# Altium PCB video.altium-saved.PcbDoc (part 5 of 5)
Units mil, origin at the board's own origin, x right, y up, seen from the top; angles counter-clockwise.
Board outline 12285 x 4200 mil, 4 copper layers (top_copper, Mid-Layer 1, Mid-Layer 2, Bottom Layer), stack 68.6 mil thick; 189 components, 588 nets, 2118 pads, 808 vias.
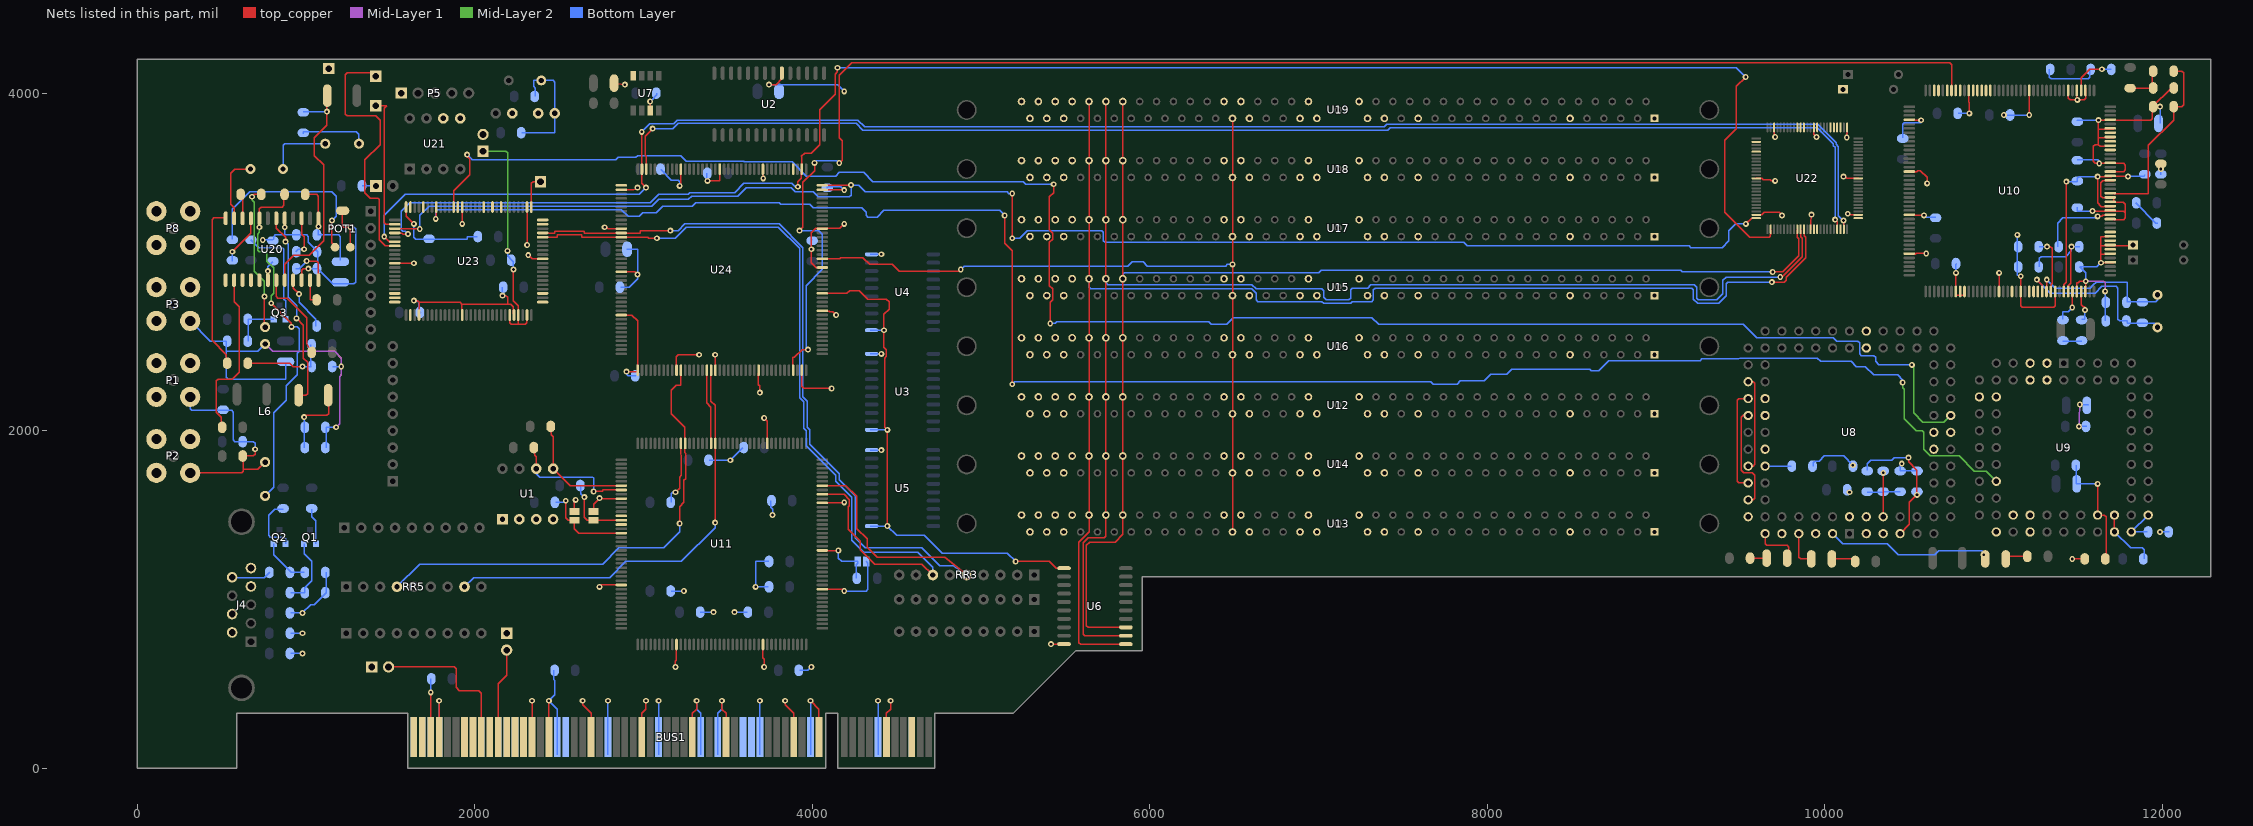
[diagram p7: the nets of this part, all layers, seen from the top]

## Via types
v1: diameter 35, hole 15.75, top_copper to Bottom Layer, 807 vias
v2: diameter 31.5, hole 15.75, top_copper to Bottom Layer, 1 vias

## Nets (pads, with @x,y where several pads share a name; then routed paths per layer and width w, separated by ;. In a path a pad name is that pad's centre, name@x,y a point inside that pad or via, vN(x,y) a via of type N, cw(c..) or ccw(c..) an arc to the next point about the centre after c; other vN are vias at no path point) (continued)
/TVRAM29: U6.13 U12.60 U13.60 U14.60 U15.60 U16.60 U17.60 U18.60 U19.60 U22.60 | length 7768.6
  top_copper w7.87: U19.60@5840,3950 U18.60@5840,3600 U17.60@5840,3250 U15.60@5840,2900 U16.60@5840,2550 U12.60@5840,2200 U14.60@5840,1850 U13.60@5840,1500 5840,1385 5795,1340 5645,1340 5625,1320 5625,845 5635,835 U6.13@5865,835 ; v1(9690,2940) 9750,2940 9845,3035 9845,3136 9836,3145 U22.60@9836,3190
  Bottom Layer w7.87: U15.60@5840,2900 5840,2925 5850,2935 7000,2935 7015,2950 9145,2950 9155,2940 v1(9690,2940)
/TVRAM30: U6.12 U12.62 U13.62 U14.62 U15.62 U16.62 U17.62 U18.62 U19.62 U22.61 | length 8203.7
  top_copper w7.87: U19.62@5740,3950 U18.62@5740,3600 U17.62@5740,3250 U15.62@5740,2900 U16.62@5740,2550 U12.62@5740,2200 U14.62@5740,1850 U13.62@5740,1500 5740,1375 5730,1365 5635,1365 5605,1335 5605,795 5615,785 U6.12@5865,785 ; v1(9735,2910) 9745,2910 9865,3030 9865,3141 9856,3150 U22.61@9856,3190
  Bottom Layer w7.87: U15.62@5740,2900 5740,2875 5750,2865 6605,2865 6630,2840 7020,2840 7030,2830 7030,2790 7045,2775 7180,2775 7190,2785 7190,2835 7200,2845 7290,2845 7310,2865 9225,2865 9240,2850 9240,2785 9250,2775 9360,2775 9395,2810 9395,2890 9415,2910 v1(9735,2910)
/TVRAM31: U6.11 U12.64 U13.64 U14.64 U15.64 U16.64 U17.64 U18.64 U19.64 U22.62 | length 8352
  top_copper w7.87: U19.64@5640,3950 U18.64@5640,3600 U17.64@5640,3250 U15.64@5640,2900 U16.64@5640,2550 U12.64@5640,2200 U14.64@5640,1850 U13.64@5640,1500 5640,1400 5580,1340 5580,745 5590,735 U6.11@5865,735 ; v1(9685,2880) 9760,2880 9770,2890 9770,2910 9885,3025 9885,3146 9876,3155 U22.62@9876,3190
  Bottom Layer w7.87: U15.64@5640,2900 5640,2850 5650,2840 6605,2840 6630,2815 6630,2775 6640,2765 7020,2765 7030,2755 7190,2755 7200,2765 7315,2765 7325,2775 7325,2835 7335,2845 9210,2845 9220,2835 9220,2780 9245,2755 9370,2755 9415,2800 9415,2870 9425,2880 v1(9685,2880)
/VD_PAL-: U10.34 U24.37 | length 8969.4
  top_copper w7.87: U24.37@3886,2340 3886,2435 3895,2435 3940,2480 v1(3975,2480) ; v1(3925,3185) 3945,3205 3945,3471.59 4013.63,3540.23 v1(4013.63,3586.64) ; v1(4160,3585.63) 4177.5,3603.13 4177.5,3718.42 4160,3735.92 4160,4105 4235,4180 10740,4180 10751,4169 U10.34@10751,4030
  Bottom Layer w7.87: v1(3925,3185) 4040,3185 4060,3165 4060,2955 3965,2860 3965,2490 v1(3975,2480) ; v1(4013.63,3586.64) 4026.07,3599.08 4146.55,3599.08 v1(4160,3585.63)
/WRAM-: U12.47 U13.47 U14.47 U15.47 U16.47 U17.47 U18.47 U19.47 U24.63 | length 4939.4
  top_copper w7.87: U24.63@4078,3018 4165,3018 4165,3025 4300,3025 4340,2985 4475,2985 4515,2945 4870,2945 v1(4880,2955) ; U13.47@6490,1400 U14.47@6490,1750 U12.47@6490,2100 U16.47@6490,2450 U15.47@6490,2800 v1(6490,2985) U17.47@6490,3150 U18.47@6490,3500 U19.47@6490,3850
  Bottom Layer w7.87: v1(4880,2955) 4900,2975 5870,2975 5895,3000 5960,3000 5985,2975 6450,2975 6460,2985 v1(6490,2985)
/WRCAD-: U8.24 U23.69 | length 10662.8
  top_copper w7.87: U23.69@1876,3320 1876,3365 1875,3365 1875,3420 1970,3515 1970,3609.54 1955.69,3623.85 v1(1955.69,3635) ; v1(5410,2635) 5410,2760 5425,2775 5425,2840 5405,2860 5405,3115 5425,3135 5425,3170 5405,3190 5405,3385 5430,3410 v1(5430,3460)
  Mid-Layer 2 w7.87: v1(10515,2390) 10525,2380 10525,2105 10580,2050 10705,2050 U8.24@10745,2090
  Bottom Layer w7.87: v1(1955.69,3635) 1985.69,3605 2835,3605 2850,3620 2955,3620 2965,3630 3220,3630 3255,3595 3594.35,3595 3597.23,3592.13 3881.55,3592.13 3965.99,3507.7 4043.28,3507.7 4043.4,3507.82 4123.56,3507.82 4138.88,3507.82 4161.07,3530 4305,3530 4360,3475 5250,3475 5265,3460 v1(5430,3460) ; v1(5410,2635) 5440,2635 5450,2645 6350,2645 6365,2630 6455,2630 6495,2670 7315,2670 7355,2630 9515,2630 9595,2550 10050,2550 10070,2530 10195,2530 10205,2520 10205,2455 10215,2445 10290,2445 10300,2435 10300,2410 10320,2390 v1(10515,2390)
/WRCDA-: U9.23 U23.73 | length 11036.1
  top_copper w7.87: v1(1770,3255) 1770,3265 1773,3265 U23.73@1773,3320 ; v1(5140,3275) 5140,3110 5185,3065 v1(5185,2275)
  Mid-Layer 2 w7.87: v1(10460,2285) 10460,2255 10470,2245 10470,2070 10540,2000 10575,2000 10585,1990 10585,1890 10625,1850 10795,1850 10885,1760 10955,1760 U9.23@11015,1700
  Bottom Layer w7.87: v1(1770,3255) 1770,3300 1780,3310 2870,3310 2910,3270 2975,3270 2995,3290 3075,3290 3115,3330 3290,3330 3310,3350 3805,3350 3815,3340 3985,3340 4005,3320 4295,3320 4320,3295 4320,3275 4330,3265 4385,3265 4425,3305 5110,3305 v1(5140,3275) ; v1(5185,2275) 5200,2290 7665,2290 7680,2275 7820,2275 7840,2295 7980,2295 8020,2335 8115,2335 8145,2365 8605,2365 8615,2355 8660,2355 8720,2415 9260,2415 9270,2425 9490,2425 9495,2430 9955,2430 9975,2410 10155,2410 10185,2380 10240,2380 10290,2330 10430,2330 10460,2300 v1(10460,2285)
/WRFIFDO-: RR5.8 U11.102 U24.18 | length 2555.3
  top_copper w7.87: U24.18@3400,2340 3400,2175 3425,2150 3425,1943 v1(3425,1455)
  Bottom Layer w7.87: RR5.8@1940,1075 1995,1130 2800,1130 2895,1225 3225,1225 3425,1425 v1(3425,1455)
/WRFULL: U11.103 U24.17 | length 407.8
  top_copper w7.87: U24.17@3374,2340 3374,2166 3400,2140 U11.103@3400,1943
/WRITE_RAM: U3.1 U4.1 U5.1 U6.1 U24.55 | length 3193.5
  top_copper w7.87: U24.55@4078,2813 4205,2813 4222,2830 4280,2830 4330,2780 4440,2780 4455,2765 4455,2720 4425,2690 v1(4425,2595) 4425,2495 4440,2480 4440,2440 4430,2430 4430,2020 v1(4445,2005) v1(4445,1435) ; v1(5205,1225) 5405,1225 5445,1185 U6.1@5485,1185
  Bottom Layer w7.87: U5.1@4345,1435 v1(4445,1435) 4500,1380 4665,1380 4770,1275 5155,1275 v1(5205,1225) ; U3.1@4345,2005 v1(4445,2005) ; U4.1@4345,2595 v1(4425,2595)
/X_CLK: U22.74 U23.86 U24.119 | length 9866
  top_copper w7.87: v1(1464.8,3149.41) 1494.21,3120 U23.86@1530,3120 ; v1(2990,3770) 2990,3568 2990,3465 v1(3015,3440) ; v1(10109.68,3244.68) 10111.54,3242.83 U22.74@10111.54,3193.33
  Bottom Layer w7.87: v1(1464.8,3149.41) 1464.8,3274.8 1590,3400 2975,3400 v1(3015,3440) ; v1(2990,3770) 3038.5,3818.5 3178.5,3818.5 3200,3840 4270,3840 4310,3800 7390,3800 7405,3815 9956.62,3815 10065.69,3705.93 10065.69,3695.93 10080,3681.62 10080,3274.37 v1(10109.68,3244.68)
/X_DATA: U22.72 U24.118 | length 7830.9
  top_copper w7.87: U24.118@3016,3568 3016,3625.87 3010,3631.87 3010,3744.19 v1(3055,3789.19) ; v1(10060,3250) 10072,3238 U22.72@10072,3190
  Bottom Layer w7.87: v1(3055,3789.19) 3174.19,3789.19 3205,3820 4260,3820 4300,3780 7410,3780 7425,3795 9954.35,3795 10049.94,3699.41 10049.94,3689.41 10060,3679.35 v1(10060,3250)
/X_DONE: U22.50 U23.83 U24.80 | length 8930.8
  top_copper w7.87: U23.83@1530,3197 1620,3197 1625,3195 v1(1675,3195) ; U24.80@4078,3453 4080,3455 v1(4230,3455) ; v1(5185,3140) v1(5185,3405) ; v1(9531,3225) 9565,3259 U22.50@9590,3259
  Bottom Layer w7.87: v1(1675,3195) 1675,3275 1730,3330 3050,3330 3090,3370 3265,3370 3285,3390 3560,3390 3610,3440 3875,3440 3900,3415 4005,3415 4035,3385 4220,3385 4230,3395 v1(4230,3455) 4275,3455 4315,3415 5155,3415 5165,3405 v1(5185,3405) ; v1(5185,3140) 5230,3140 5275,3185 5715,3185 5725,3175 5725,3125 5735,3115 7860,3115 7880,3095 9195,3095 9205,3085 9390,3085 9430,3125 9430,3185 9470,3225 v1(9531,3225)
/X_IRQ: RR5.4 U11.109 U24.11 | length 2837.8
  top_copper w7.87: v1(3215,1450) 3215,1550 3240,1575 3240,1705 3250,1715 3250,1865 3246,1869 3246,1943 3246,2019 3165,2100 3165,2240 3195,2270 3221,2270 U24.11@3221,2340
  Bottom Layer w7.87: RR5.4@1540,1075 1675,1210 2760,1210 2855,1305 3120,1305 3215,1400 v1(3215,1450)
/X_PROG-: U22.52 U23.84 U24.82 | length 10122.8
  top_copper w7.87: U23.84@1530,3171 1550,3170 1570,3170 1575,3165 v1(1605,3165) ; v1(3915,3445) 3915,3473.62 3935.69,3494.31 3935.69,3546.48 3938.43,3549.21 3938.43,3621.83 3935.69,3624.56 3954.55,3643.42 3993.87,3643.42 4045,3694.55 4045,3901.62 4136.5,3993.12 4136.5,4112.06 4149.49,4125.05 v1(4149.49,4149.8) ; v1(9530,4095) 9475,4040 9475,3790 9405,3720 9405,3295 9555,3145 9668.62,3145 9676.5,3152.87 9676.5,3161.5 9680,3165 9680,3190 U22.52@9679,3190
  Bottom Layer w7.87: v1(1605,3165) 1590,3180 1575,3180 1565,3190 1565,3300 1615,3350 3040,3350 3090,3400 3265,3400 3275,3410 3540,3410 3595,3465 3880,3465 3900,3445 v1(3915,3445) ; v1(4149.49,4149.8) 9475.2,4149.8 v1(9530,4095)
/Y_OUT: J4.9 R40.2 | length 232.4
  Bottom Layer w7.87: J4.9@565,1130 755,1130 R40.2@785,1160
/{slash}PCRD: RR3.7 U11.72 U23.46 U24.133 | length 5062.2
  top_copper w7.87: U23.46@2400,3146 2490,3146 2490,3160 2635,3160 2635,3146 2850,3146 3030,3146 3030,3140 v1(3080,3140) ; U11.72@4078,1623 4190,1623 4220,1590 4220,1555 4215,1550 4215,1415 4285,1345 4285,1295 4370,1210 4650,1210 RR3.7@4715,1145
  Bottom Layer w7.87: v1(3080,3140) 3190,3140 3255,3205 3800,3205 3925,3080 3925,2195 3950,2170 3950,2015 3965,2000 3965,1910 4140,1735 4140,1700 4235,1605 4235,1350 4305,1280 4625,1280 4715,1190 RR3.7@4715,1145
/{slash}PCWR: RR3.5 U11.74 U23.47 U24.132 | length 5435.4
  top_copper w7.87: U23.47@2400,3171 2475,3171 2475,3180 2650,3180 2650,3171 2850,3171 2980,3171 2980,3185 v1(3160,3185) ; U11.74@4078,1674 4200,1674 4265,1610 4265,1420 4325,1360 4325,1310 4385,1250 4785,1250 RR3.5@4915,1145
  Bottom Layer w7.87: v1(3160,3185) 3205,3185 3245,3225 3805,3225 3945,3085 3945,2200 3970,2175 3970,2020 3985,2005 3985,1920 4160,1745 4160,1710 4255,1615 4255,1365 4315,1305 4650,1305 4755,1200 4835,1200 RR3.5@4915,1145
GND: BUS1.A18 BUS1.A24 BUS1.A30 BUS1.A35 BUS1.A37 BUS1.A42 BUS1.A48 BUS1.A56 BUS1.B3 BUS1.B15 BUS1.B17 BUS1.B22 BUS1.B28 BUS1.B34 BUS1.B38 BUS1.B46 BUS1.B49 BUS1.B57 C2.2 C6.2 C7.2 C9.2 C10.2 C11.2 C12.2 C13.2 C14.2 C15.2 C16.2 C17.2 C18.2 C19.2 C20.2 C21.2 C22.2 C23.2 C24.2 C25.2 C26.2 C27.2 C28.2 C29.2 C30.2 C31.2 C32.1 C33.2 C37.1 C38.2 C43.2 C44.2 C45.2 C46.2 C47.2 C48.1 C49.2 C50.2 C51.2 C52.2 C53.2 C54.2 C55.2 C56.2 C57.2 C62.2 C63.2 C64.2 C65.1 C66.1 C67.2 C68.2 C69.2 C70.2 C71.2 C72.2 C73.2 CV1.2 D1.1 D3.1 J4.4 J4.5 J4.6 J4.7 L6.3 P1.2 P2.2 P3.2 P4.2 P5.1 P8.2 P12.1 POT1.1 POT1.2 R8.2 R14.2 R15.1 R31.1 R32.2 R33.2 R34.2 R37.1 R38.2 R42.1 R43.1 R44.1 R45.2 R46.2 R47.2 U1.1 U1.2 U1.3 U1.4 U2.20 U3.10 U4.10 U5.10 U6.10 U7.3 U8.2 U8.3 U8.21 U8.22 U8.23 U8.41 U8.42 U8.61 U8.63 U8.67 U9.3 U9.4 U9.12 U9.13 U9.31 U9.32 U10.3 U10.5 U10.7 U10.16 U10.30 U10.44 U10.56 U10.66 U10.75 U10.88 U10.89 U10.90 U10.98 U10.103 U10.111 U10.116 U10.118 U10.124 U10.126 U10.128 U10.130 U10.134 U10.136 U10.138 U10.139 U10.143 U10.145 U10.147 U10.151 U10.153 U10.155 U10.157 U11.10 U11.30 U11.50 U11.70 U11.90 U11.110 U11.130 U11.150 U12.1 U12.39 U12.72 U13.1 U13.39 U13.72 U14.1 U14.39 U14.72 U15.1 U15.39 U15.72 U16.1 U16.39 U16.72 U17.1 U17.39 U17.72 U18.1 U18.39 U18.72 U19.1 U19.39 U19.72 U20.10 U20.17 U21.5 U22.1 U22.11 U22.23 U22.38 U22.49 U22.64 U22.77 U22.88 U23.4 U23.14 U23.26 U23.41 U23.52 U23.67 U23.80 U23.91 U24.1 U24.10 U24.19 U24.29 U24.39 U24.51 U24.61 U24.70 U24.79 U24.91 U24.101 U24.110 U24.122 U24.131 U24.141 U24.151 W1.1 W2.1 W3.1 W4.1 W5.1 | length 29938.1
  top_copper w7.87: P2.2@315,1750 620,1750 630,1760 630,1770 ; v1(700,1890) 700,1860 690,1850 630,1850 630,1770 ; L6.3@759.05,1813.74 715.31,1770 630,1770 ; v1(875,3205) U20.17@875,3265 ; U20.10@975,2885 975,2950 985,2960 v1(1015,2960) ; POT1.2@1216.91,3300 1216.91,3213.09 1225,3205 v1(1265,3205) 1263.62,3203.62 POT1.1@1263.62,3086.73 ; U23.91@1530,2992 v1(1640,2992) ; U23.80@1594,3320 1594,3270 v1(1640,3225) ; v1(1640,2770) 1661,2770 1671,2760 ; U23.4@1671,2690 1671,2760 ; BUS1.B3@1740,80 BUS1.B3@1740,185 v1(1740,450) ; U23.14@1927,2690 1925,2695 1925,2750 ; v1(1927,3225) U23.67@1927,3320 ; v1(2165,2800) 2185,2800 2195,2790 2195,2750 ; U23.26@2234,2690 2230,2695 2230,2735 2215,2750 2195,2750 ; v1(2311,3100) U23.52@2311,3320 ; v1(2318,3040) 2340,3018 U23.41@2400,3018 ; BUS1.B15@2340,80 BUS1.B15@2340,185 v1(2340,400) ; BUS1.B17@2440,80 BUS1.B17@2440,185 v1(2440,400) ; W2.1@2590.79,1521.46 2590.79,1582.48 v1(2598.66,1590.35) ; v1(2640,400) 2640,375 2690,325 BUS1.B22@2690,185 BUS1.B22@2690,80 ; W3.1@2704.96,1521.46 2704.96,1564.96 v1(2740,1600) 2740,1598 U11.130@2850,1598 ; v1(2740,1075) 2740,1086 U11.150@2850,1086 ; v1(2770,3205) 2785,3205 2790,3200 2790,3197 U24.131@2850,3197 ; C63.2@2827.7,4059.15 v1(2890,4050) ; U24.151@2850,2685 2930,2685 2965,2650 U24.1@2965,2340 ; U24.141@2850,2941 2949,2941 v1(2965,2925) ; U24.122@2850,3427 2942,3427 v1(2965,3440) ; v1(2900,2350) U24.1@2965,2350 ; BUS1.B28@2990,80 BUS1.B28@2990,185 2990,325 3015,350 v1(3015,400) ; U7.3@3040,3895 v1(3040,3950) ; v1(3190,600) 3190,635 3195,640 U11.10@3195,715 ; v1(3190,1635) 3215,1660 3215,1725 3225,1735 3225,1855 3221,1859 U11.110@3221,1943 ; U24.10@3195,2340 3195,2437.5 3207.5,2450 v1(3330,2450) ; v1(3215,3450) 3221,3450 U24.110@3221,3568 ; BUS1.B34@3290,80 BUS1.B34@3290,185 3290,325 3315,350 v1(3315,400) ; v1(3380,3480) 3451,3480 U24.101@3451,3568 ; U24.19@3425,2340 v1(3425,2450) ; v1(3465,400) 3465,350 3490,325 BUS1.B38@3490,185 BUS1.B38@3490,80 ; U24.29@3681,2340 3681,2270 3690,2270 v1(3690,2225) ; U11.30@3707,715 3707,655 3715,647 v1(3715,600) ; U24.91@3707,3568 3707,3515 3710,3515 v1(3710,3495) ; v1(3715,2075) 3733,2057 U11.90@3733,1943 ; v1(3744.33,4050) 3786.49,4050 3820,4083.51 U2.20@3820,4120.04 ; v1(3840,400) 3840,375 3890,325 BUS1.B46@3890,185 BUS1.B46@3890,80 ; U24.39@3937,2340 3937,2262.5 3949.5,2250 v1(4115,2250) ; v1(3990,400) 4040,350 BUS1.B49@4040,185 BUS1.B49@4040,80 ; U24.51@4064.21,2706.89 4102.2,2706.89 4104.57,2704.53 4123.13,2704.53 v1(4141.97,2685.69) ; U24.61@4076,2965 4025,2965 3995,2995 v1(3995,3075) 3995,3171.73 4021.5,3198.23 4163.23,3198.23 v1(4190,3225) ; U11.50@4078,1060 4190,1060 v1(4190,1050) ; U11.70@4078,1572 4190,1572 v1(4190,1575) ; U24.79@4078,3427 4190,3427 v1(4190,3425) ; BUS1.B57@4440,80 BUS1.B57@4440,185 4440,325 4465,350 v1(4465,400) ; v1(5415,735) U6.10@5485,735 ; U22.49@9590,3278 9625,3278 9639.55,3292.55 9727.64,3292.55 v1(9745.14,3275.05) ; U22.38@9590,3495 9625,3495 9634.7,3485.3 9674.96,3485.3 9680.25,3480 v1(9705,3480) ; U22.23@9700,3798 9700,3745 v1(9705,3740) ; U22.64@9915,3190 9915,3250.25 9920,3255.25 v1(9920,3280) ; U22.11@9934.37,3796.67 9934.37,3755.63 v1(9950,3740) ; v1(10110,3505) 10120,3505 10130,3495 U22.88@10200,3495 ; v1(10129.14,3736.56) 10129.14,3761.31 10131,3763.17 U22.1@10131,3800 ; v1(10135,3285) 10140,3280 U22.77@10199,3280 ; U10.75@10482,3045 10535,3045 10540,3050 v1(10600,3050) ; U10.66@10482,3275 10586.46,3275 v1(10586.85,3275.39) ; U10.56@10482,3531 10535,3531 10535,3535 10545,3535 10550,3540 10565,3540 10605,3500 v1(10605,3465) ; U10.44@10482,3839 v1(10570,3839) ; v1(10776,2935) 10776,2802 10802,2802 U10.90@10827,2802 ; U10.30@10853,4030 10853,3945 10855,3945 v1(10855,3880) ; U10.98@11032,2802 v1(11032,2935) ; v1(11160,2915) 11160,2802 11160,2740 11170,2730 11355,2730 11365,2740 U10.111@11365,2802 ; v1(11210,3870) 11210,3950 11211,3950 U10.16@11211,4030 ; U10.7@11442,4030 11442,3970 11452,3960 11535,3960 11545,3970 11545,4030 U10.3@11544,4030 ; v1(11465,1240) R8.2@11535,1240 ; U10.116@11493,2802 11493,2875 11500,2875 11510,2885 v1(11545,2885) U10.118@11545,2805 ; v1@11493,3960 U10.5@11493,4030 ; v1(11585,3301) 11710,3301 11725,3300 11770,3300 11780,3290 ; v1(11620,3840) v1@11620,3839 ; U10.130@11680,3150 11635,3150 11635,3096 ; U10.124@11710,2994 11670,2995 v1(11635,2995) 11635,3045 ; U10.126@11710,3045 11635,3045 ; U10.134@11710,3250 11770,3250 11780,3260 11780,3290 ; U10.143@11710,3480 11645,3480 11635,3470 11635,3390 11645,3380 11710,3380 11710,3354.13 11765.87,3354.13 11780,3340 11780,3290 ; U10.145@11710,3531 11715,3535 11770,3535 11780,3545 11780,3573 11770,3583 11710,3583 v1(11625,3583) 11600,3585 11590,3595 11590,3685 11600,3695 11620,3695 ; U10.151@11710,3685 11630,3685 11620,3695 ; U10.153@11710,3736 11620,3736 ; U10.155@11710,3787 11620,3787 ; D3.1@11825,3100 11820,3095 11820,3096 11710,3096 11635,3096 ; v1(11985,3920) R14.2@11940,3920 ; C47.2@12070,4030 12050,4030 R14.2@11940,3920 ; 1671,2760 1915,2760 1925,2750 ; 1925,2750 2195,2750 ; 11620,3695 11620,3736 ; 11620,3736 11620,3787 ; 11620,3787 v1@11620,3839 ; v1@11620,3839 11710,3839 11930,3839 11940,3849 R14.2@11940,3920 ; 11635,3045 11635,3096
  Mid-Layer 1 w7.87: L6.3@759.05,2513.74 802.79,2470 1170,2470 1210,2430 v1(1210,2380) 1210,2330 1200,2320 1200,2040 v1(1180,2020) ; v1@9745,3275.2 v1(9745.14,3275.05) ; v1(10145,1635) v1@10145,1640 ; v1@11030,2935 v1(11032,2935) ; v1(11505,2025) 11505,2110 11510,2115 v1(11510,2155) ; v1(11545,2885) 11650,2885 11660,2875 v1(11660,2825) ; v1@11975,1400 v1(11985,1400)
  Bottom Layer w7.87: P1.2@315,2200 315,2130 325,2120 510,2120 560,2120 570,2110 570,1945 580,1935 630,1935 690,1935 700,1925 v1(700,1890) ; P3.2@315,2650 435,2530 530,2530 530,2470 ; v1(745,3130) 805,3130 810,3135 810,3150 820,3160 875,3160 ; L6.3@759.05,2513.74 715.31,2470 530,2470 ; v1(875,3205) 875,3160 ; C55.2@880,2400 880,2305 540,2305 530,2315 530,2470 ; R42.1@910,680 v1(980,680) ; R43.1@910,800 v1(980,800) ; R44.1@910,920 v1(980,920) 1030,970 1050,970 1120,1040 R33.2@1120,1160 ; C54.2@985,3760 985,3770 1300,3770 1315,3755 CV1.2@1315,3700 ; v1(1015,2960) C43.2@1070,2960 ; C46.2@1120,1900 1120,2020 v1(1180,2020) ; R31.1@1160,2380 v1(1210,2380) ; v1(1265,3205) 1285,3205 1295,3195 1295,2880 1285,2870 1205,2870 1160,2870 C43.2@1070,2960 ; v1(1640,2770) 1660,2770 1670,2760 1670,2710 C73.2@1680,2700 ; v1(1640,3225) 1640,3145 1650,3135 1730,3135 1955,3135 1955,3150 C71.2@2015,3150 ; v1(1740,450) C67.2@1740,530 ; v1(2165,2800) C72.2@2165,2850 ; C68.2@2470,580 2470,525 2475,520 2475,435 v1(2440,400) 2490,350 BUS1.A18@2490,185 BUS1.A18@2490,80 ; BUS1.A24@2790,80 BUS1.A24@2790,185 v1(2790,400) ; C21.2@2865,2850 2915,2850 2965,2900 v1(2965,2925) 2965,3075 C56.2@2901.71,3075 ; v1(2900,2350) 2900,2335 2910,2325 C22.2@2955,2325 ; v1(3040,3950) 3080,3990 C23.2@3080,4000 ; BUS1.A30@3090,80 BUS1.A30@3090,185 v1(3090,400) ; C20.2@3105,3550 3105,3545 3165,3485 3205,3485 3215,3475 v1(3215,3450) ; C31.2@3165,1050 v1(3240,1050) ; C27.2@3165,1575 3165,1625 3175,1635 v1(3190,1635) ; v1(3315,400) 3315,350 3340,325 BUS1.A35@3340,185 BUS1.A35@3340,80 ; C30.2@3337.7,925 v1(3415,925) ; C19.2@3375,3525 3375,3480 v1(3380,3480) ; C24.2@3390,1825 v1(3515,1825) C25.2@3590,1900 ; BUS1.A37@3440,80 BUS1.A37@3440,185 3440,325 3465,350 v1(3465,400) ; v1(3540,925) C29.2@3615,925 ; BUS1.A42@3690,80 BUS1.A42@3690,185 v1(3690,400) ; C28.2@3740,1075 v1(3665,1075) 3665,1225 C38.2@3742.3,1225 ; v1(3744.33,4050) 4150,4050 v1(4190,4010) ; C26.2@3755,1585 3755,1545 3765,1535 v1(3765,1500) ; C69.2@3925,580 3975,580 v1(3995,600) ; BUS1.A48@3990,80 BUS1.A48@3990,185 v1(3990,400) ; v1(3995,3075) 3995,3130 C17.2@4000,3130 ; C18.2@4090,3435 4090,3445 4170,3445 v1(4190,3425) ; v1(4190,1050) 4320,1050 4330,1060 4330,1215 W1.1@4320,1225 ; U5.10@4345,1885 v1(4410,1885) ; U3.10@4345,2455 v1(4410,2455) ; U4.10@4345,3045 v1(4410,3045) ; BUS1.A56@4390,80 BUS1.A56@4390,185 v1(4390,400) ; R38.2@9930,1790 9930,1810 9940,1820 9965,1820 9995,1850 10110,1850 v1(10165,1795) C52.2@10165,1790 ; v1(10455,1805) 10445.12,1795.12 10445.12,1762.7 R15.1@10545,1762.7 ; C11.2@10460,3735 10460,3815 10470,3825 10570,3825 v1(10570,3839) ; v1(10586.85,3275.39) 10597.24,3265 C14.2@10655,3265 ; v1(10776,2935) 10776,2985 C15.2@10780,2990 ; C13.2@10790,3880 v1(10855,3880) ; v1(11060,3870) 11100,3870 v1(11210,3870) ; v1(11140,3160) 11140,3090 11140,2970 11140,2925 11150,2915 v1(11160,2915) ; C12.2@11495,3325 11495,3301 v1(11585,3301) ; C6.2@11495,3605 11615,3605 11625,3595 v1(11625,3583) ; C2.2@11495,3835 11495,3840 v1(11620,3840) ; v1(11505,2025) C33.2@11550,2025 ; v1(11510,2155) 11560,2155 C51.2@11560,2150 ; v1(11545,2885) 11545,2935 11510,2970 11610,2970 v1(11635,2995) ; C66.1@11660,2650 11660,2760 v1(11660,2825) ; v1(11985,1400) C32.1@12040,1400 ; C62.2@11985,3820 v1(11985,3920) ; 875,3160 940,3160 1005,3160 1015,3150 1015,3115 1070,3060 C43.2@1070,2960 ; R37.1@10135,1650 10145,1640 v1(10145,1635) R37.1@10135,1650
  other v1: 11495,3960
Net-(BUS1-PRSNT1#): BUS1.B9 W5.2 | length 1043.6
  top_copper w7.87: W5.2@1490,600 1880,600 1890,590 1890,480 1910,460 2025,460 2040,445 BUS1.B9@2040,185 BUS1.B9@2040,80
Net-(BUS1-PRSNT2#): BUS1.B11 W4.2 | length 535.7
  top_copper w7.87: BUS1.B11@2140,185 2140,500 2190,550 W4.2@2190,700
Net-(BUS1-TDI): BUS1.A4 BUS1.B4 | length 640
  top_copper w7.87: BUS1.B4@1790,80 BUS1.B4@1790,185 v1(1790,400)
  Bottom Layer w7.87: BUS1.A4@1790,80 BUS1.A4@1790,185 v1(1790,400)
Net-(C1-Pad1): C1.1 C47.1 R35.1 | length 235.8
  top_copper w7.87: R35.1@11807.32,4027.95 11809.37,4030 C47.1@11942.3,4030 ; C47.1@11940,4030 C1.1@11940,4130
Net-(C3-Pad1): C3.1 R3.2 | length 70
  top_copper w7.87: v1(11990,3550) C3.1@11990,3585
  Bottom Layer w7.87: R3.2@11990,3515 v1(11990,3550)
Net-(C4-Pad1): C4.1 R2.2 | length 179.7
  Bottom Layer w7.87: C4.1@11840,3350 11960,3230 R2.2@11970,3230
Net-(C5-Pad2): C5.2 R19.1 | length 110
  Bottom Layer w7.87: R19.1@11410,2530 C5.2@11520,2530
Net-(C8-Pad2): C8.2 R20.1 | length 338.3
  Bottom Layer w7.87: R20.1@11330,4140 11330,4095 11340,4085 11560,4085 11570,4095 C8.2@11570,4140
Net-(C36-Pad2): C36.2 C37.2 R36.1 | length 195.1
  Bottom Layer w7.87: C36.2@10250,1635 R36.1@10345,1635 ; R36.1@10345,1637.3 C37.2@10445.12,1637.3
Net-(C39-Pad2): C39.2 R24.2 | length 130
  top_copper w7.87: C39.2@11080,1240 11080,1255 R24.2@11195,1255
Net-(C40-Pad2): C40.2 R23.2 | length 140
  top_copper w7.87: C40.2@10050,1240 10175,1240 R23.2@10175,1225
Net-(C41-Pad2): C41.2 R22.2 | length 85
  top_copper w7.87: R22.2@9560,1245 C41.2@9645,1245
Net-(C46-Pad1): C46.1 C53.1 L1.2 | length 443.3
  top_copper w7.87: v1(990,2080) 1000,2090 1125,2090 1135,2100 L1.2@1135,2210
  Bottom Layer w7.87: C46.1@990,1900 990,2020 v1(990,2080)
Net-(C49-Pad1): C49.1 R21.1 R26.2 X1.1 | length 721.4
  Bottom Layer w7.87: R21.1@2280,3765 2475,3765 C49.1@2475,3880 2475,4065 2465,4075 X1.1@2395,4075 2353.24,4075 2350,4071.76 2350,4040 2360,4030 R26.2@2360,3980
Net-(C61-Pad1): C61.1 R30.1 R31.2 | length 511.5
  top_copper w7.87: C61.1@660,2400 905,2400 925,2380 v1(980,2380)
  Bottom Layer w7.87: v1(980,2380) 1032.3,2380 1030,2382.3 R30.1@1030,2510
Net-(CV1-Pad1): CV1.1 X3.1 | length 394.1
  Bottom Layer w7.87: X3.1@865,3550 865,3690 875,3700 CV1.1@1115,3700
Net-(D6-A): D6.1 R13.2 | length 81
  Bottom Layer w7.87: R13.2@1334.4,3450.94 1335.34,3450 D6.1@1415,3450
Net-(L6-Pad1): L6.1 R10.1 | length 864.7
  top_copper w7.87: v1(681.34,3385.63) 695.71,3400 R10.1@736.02,3400 ; v1(755,2795) 755,2617.79 L6.1@759.05,2613.74
  Mid-Layer 2 w7.87: v1(681.34,3385.63) 681.34,3365.94 695,3352.28 695,2945 755,2885 v1(755,2795)
Net-(P4-P1): P4.1 R48.2 U23.25 U23.27 U23.29 | length 1401.4
  top_copper w7.87: U23.25@2208,2690 2208,2640 2218,2630 2259,2630 ; v1(2230,2955) 2230,2770 2260,2740 2260,2705 2259,2690 2259,2630 ; U23.29@2311,2690 2310,2670 2310,2640 2300,2630 2259,2630
  Mid-Layer 2 w7.87: P4.1@2050,3655 2185,3655 2195,3645 v1(2195,3065)
  Bottom Layer w7.87: v1(2195,3065) 2195,3035 2220,3010 2230,3000 v1(2230,2955)
Net-(POT1-Pad3): POT1.3 R9.1 | length 1166.6
  top_copper w7.87: v1(1155,3245) 1155,3111.91 1173.07,3093.84 POT1.3@1173.07,3086.73
  Bottom Layer w7.87: R9.1@565,3135 565,3312.74 667.26,3415 1155,3415 1180,3390 1180,3270 v1(1155,3245)
Net-(Q1-B): Q1.2 R16.1 | length 215.4
  Bottom Layer w7.87: R16.1@1035,1535 1035,1490 1060,1465 Q1.2@1060,1330
Net-(Q1-E): Q1.1 R32.1 R39.2 | length 410.2
  Bottom Layer w7.87: R39.2@910,1040 990,1040 995,1040 995,1070 1035,1110 1035,1225 990,1270 Q1.1@990,1330
Net-(Q2-B): Q2.2 R17.1 | length 357.8
  Bottom Layer w7.87: R17.1@865,1535 815,1535 780,1500 780,1380 790,1370 870,1370 880,1360 Q2.2@880,1330
Net-(Q2-E): Q2.1 R33.1 R40.1 | length 293.5
  Bottom Layer w7.87: Q2.1@810,1330 810,1265 R40.1@915,1160 ; R40.1@910,1160 R33.1@990,1160
Net-(Q3-B): Q3.2 R18.1 | length 636.9
  Bottom Layer w7.87: R18.1@675,3130 720,3085 860,3085 870,3075 870,2780 880,2770 Q3.2@880,2660
Net-(Q3-E): Q3.1 R34.1 R41.2 | length 280
  Bottom Layer w7.87: R34.1@660,2530 660,2660 Q3.1@810,2660
Net-(U1-SCL): R28.2 U1.6 U11.128 | length 743.5
  top_copper w7.87: R28.2@2355,1900 2355,1855 2365,1845 U1.6@2365,1775 ; v1(2705,1640) 2760,1640 2760,1649 U11.128@2850,1649
  Bottom Layer w7.87: U1.6@2365,1775 2365,1745 2385,1725 2700,1725 2705,1720 v1(2705,1640)
Net-(U1-SDA): R29.2 U1.5 U11.127 | length 681
  top_copper w7.87: R29.2@2455,2025 2455,1975 2465,1965 U1.5@2465,1775 2566,1674 U11.127@2850,1674
Net-(U8-BIN): U8.58 U8.68 | length 568.3
  top_copper w7.87: U8.68@9545,1790 9575,1790 9585,1800 9585,2280 9575,2290 U8.58@9545,2290
Net-(U8-BVID0): C41.1 U8.75 | length 273.3
  top_copper w7.87: U8.75@9645,1390 9645,1330 9655,1320 9775,1320 9785,1310 C41.1@9785,1245
Net-(U8-CEXT1): R36.2 U8.6 | length 275
  top_copper w7.87: U8.6@10345,1490 v1(10345,1750)
  Bottom Layer w7.87: v1(10345,1750) R36.2@10345,1765
Net-(U8-CEXT2): C36.1 R15.2 U8.7 | length 826.6
  top_copper w7.87: U8.7@10445,1390 10500,1445 10500,1575 v1(10545,1620) 10545,1765 10495,1815 v1(10495,1840)
  Bottom Layer w7.87: C36.1@10250,1765 10250,1805 10270,1825 10395,1825 10410,1840 v1(10495,1840) ; v1(10545,1620) R15.2@10545,1635
Net-(U8-GIN): U8.60 U8.70 | length 618.3
  top_copper w7.87: U8.70@9545,1690 9490,1690 9480,1700 9480,2180 9490,2190 U8.60@9545,2190
Net-(U8-GVID0): C40.1 U8.79 | length 209.1
  top_copper w7.87: U8.79@9845,1390 9845,1250 9855,1240 C40.1@9910,1240
Net-(U8-RIN): U8.62 U8.72 | length 630.7
  top_copper w7.87: U8.72@9545,1590 9575,1590 9585,1600 9585,1735 9570,1750 9520,1750 9505,1765 9505,2080 9515,2090 U8.62@9545,2090
Net-(U8-RSET): R38.1 U8.69 | length 155
  Bottom Layer w7.87: U8.69@9645,1790 R38.1@9800,1790
Net-(U8-RVID0): C39.1 U8.83 | length 1001.3
  top_copper w7.87: C39.1@10940,1240 v1(10940,1265)
  Bottom Layer w7.87: U8.83@10045,1390 10105,1330 10370,1330 10435,1265 10650,1265 10675,1290 10930,1290 10940,1280 v1(10940,1265)
Net-(U9-COMP): C35.2 U9.41 U9.42 | length 373.5
  top_copper w7.87: U9.41@11715,1400 U9.42@11715,1500
  Bottom Layer w7.87: U9.41@11715,1400 11810,1305 11880,1305 11890,1295 C35.2@11890,1240
Net-(U9-IREF): C34.2 C42.2 R8.1 U9.40 | length 724.1
  top_copper w7.87: v1(11615,1685) U9.40@11615,1500 11655,1500 11665,1490 R8.1@11665,1240
  Bottom Layer w7.87: C34.2@11490,1795 11490,1685 11500,1685 v1(11615,1685)
Net-(U9-VREF): C32.2 U9.43 U9.44 | length 236.4
  Bottom Layer w7.87: C32.2@11910,1400 U9.43@11815,1400 U9.44@11915,1500
Net-(U10-CLEVEL): C7.1 R27.2 U10.114 | length 632
  top_copper w7.87: U10.114@11442,2802 11442,2860 11455,2873 11455,3090 v1(11460,3090)
  Bottom Layer w7.87: C7.1@11270,2970 11270,3020 11280,3030 11425,3030 11460,3065 v1(11460,3090) R27.2@11510,3090
Net-(U10-CREF+): C6.1 R12.1 U10.113 U10.137 U10.144 | length 1434.6
  top_copper w7.87: U10.113@11416,2802 11416,2865 11430,2879 v1(11430,3475) ; U10.137@11710,3327 11635,3327 11635,3330 11615,3350 v1(11615,3505) 11700,3505 11710,3506 v1(11795,3506)
  Bottom Layer w7.87: v1(11430,3475) 11495,3475 11495,3495 11505,3505 v1(11615,3505) ; v1(11795,3506) 11890,3506 R12.1@11895,3515
Net-(U10-N{slash}C): C16.1 U10.110 | length 363.1
  top_copper w7.87: v1(11315,3090) 11335,3090 11345,3080 11345,2870 11339,2870 U10.110@11339,2802
  Bottom Layer w7.87: C16.1@11270,3090 v1(11315,3090)
Net-(U10-OUT_C): R19.2 U10.115 | length 183.2
  top_copper w7.87: v1(11465,2730) 11465,2800 U10.115@11467,2802
  Bottom Layer w7.87: R19.2@11410,2660 11410,2705 11440,2705 v1(11465,2730)
Net-(U10-R{slash}2): R27.1 U10.135 | length 488.6
  top_copper w7.87: v1(11615,3270) 11640,3270 11645,3275 U10.135@11710,3275
  Bottom Layer w7.87: R27.1@11380,3090 11380,3230 11410,3260 11605,3260 v1(11615,3270)
Net-(U10-SYNC_DET): C1.2 R14.1 U10.140 | length 1097.4
  top_copper w7.87: U10.140@11710,3403 11915,3403 11915,3690 12065,3840 12065,3920 12070,3920 12115,3920 12125,3930 12125,4120 12115,4130 C1.2@12070,4130
Net-(U10-VIN_C): C5.1 U10.117 | length 177.1
  top_copper w7.87: U10.117@11519,2802 11519,2745 11529,2735 11540,2735 v1(11540,2715)
  Bottom Layer w7.87: C5.1@11520,2660 11540,2660 v1(11540,2715)
Net-(U10-VIN_Y{slash}COMP.): C8.1 U10.4 | length 257.1
  top_copper w7.87: U10.4@11519,4030 11519,4090 11570,4141 v1(11640,4141)
  Bottom Layer w7.87: v1(11640,4141) C8.1@11695,4141
Net-(U10-XTAL1_IN): C66.2 R25.1 U10.108 X2.2 | length 1105.6
  top_copper w7.87: v1(11255,2895) 11285,2865 11288,2865 U10.108@11288,2802
  Bottom Layer w7.87: v1(11255,2895) 11335,2815 11600,2815 11640,2855 11725,2855 11735,2845 11735,2660 11745,2650 11790,2650 11790,2635 11880,2635 11955,2635 11965,2625 11965,2605 X2.2@11970,2605
Net-(U10-XTAL1_OUT): C65.2 R25.2 U10.109 X2.1 | length 939.5
  top_copper w7.87: U10.109@11314,2802 v1(11314,2895)
  Bottom Layer w7.87: v1(11314,2895) 11365,2844 11571,2844 11590,2864 11606,2880 11790,2880 C65.2@11790,2765 ; C65.2@11790,2760 C65.2@11790,2765 ; X2.1@11970,2805 11970,2775 11960,2765 11880,2765 C65.2@11790,2765
Net-(U11-FLT#): R6.1 U11.138 W2.2 | length 542.5
  top_copper w7.87: v1(2540,1585) 2540,1483.66 2553.39,1470.28 W2.2@2590.79,1470.28 2590.79,1420.06 2617.84,1393 U11.138@2850,1393
  Bottom Layer w7.87: R6.1@2480,1575 2530,1575 v1(2540,1585)
Net-(U11-MODE_16{slash}32): R5.1 U11.59 W1.2 | length 349.4
  top_copper w7.87: U11.59@4078,1290 v1(4155,1290)
  Bottom Layer w7.87: v1(4155,1290) 4155,1245 4175,1225 4270,1225 4270,1215 4260,1205 R5.1@4260,1125
Net-(U11-SNV): R7.1 U11.135 W3.2 | length 422.5
  top_copper w7.87: v1(2649.84,1606.1) 2649.84,1487.99 2667.56,1470.28 W3.2@2704.96,1470.28 2868.94,1470.28 U11.135@2869.53,1469.68
  Bottom Layer w7.87: R7.1@2630,1675 2630,1625.94 v1(2649.84,1606.1)
Net-(U20-B): C58.1 U20.11 | length 145
  top_copper w7.87: U20.11@1025,2885 1025,2775 C58.1@1060,2775
Net-(U20-B{slash}ADJ): R9.2 U20.21 | length 305.6
  top_copper w7.87: v1(565,3060) 675,3170 U20.21@675,3265
  Bottom Layer w7.87: R9.2@565,3005 v1(565,3060)
Net-(U20-CS): C61.2 U20.24 | length 969.4
  top_copper w7.87: U20.24@525,3260 455,3260 445,3250 445,2535 530,2450 C61.2@530,2400
Net-(U20-FLT): C45.1 U20.15 | length 252.4
  top_copper w7.87: U20.15@975,3265 975,3165 990,3150 v1(990,3075)
  Bottom Layer w7.87: C45.1@940,3060 955,3075 v1(990,3075)
Net-(U20-G): C59.1 U20.9 | length 320.9
  top_copper w7.87: U20.9@925,2885 925,2845 v1(960,2810)
  Bottom Layer w7.87: v1(960,2810) 960,2760 1060,2660 C59.1@1060,2620
Net-(U20-MCTR): R4.1 U20.2 | length 995.6
  top_copper w7.87: R4.1@500,2020 500,2080 470,2110 470,2295 480,2305 565,2305 605,2345 605,2735 575,2765 U20.2@575,2885
Net-(U20-NOTCH): L1.1 U20.18 | length 1180.8
  top_copper w7.87: U20.18@825,3265 825,3200 880,3145 v1(880,3120) ; v1(945,2665) 985,2625 985,2430 1010,2405 1010,2220 1000,2210 L1.1@955,2210
  Bottom Layer w7.87: v1(880,3120) 895,3105 895,2790 945,2740 v1(945,2665)
Net-(U20-OSC): U20.23 X3.2 | length 395.7
  top_copper w7.87: U20.23@575,3265 575,3320 555,3340 555,3525 580,3550 X3.2@672.09,3550
Net-(U20-R): C60.1 U20.7 | length 535.1
  top_copper w7.87: U20.7@825,2885 825,2795 835,2785 890,2785 1005,2670 1005,2515 C60.1@1033.29,2464
Net-(U20-UOFF): C44.1 U20.6 | length 127.4
  top_copper w7.87: U20.6@775,2885 v1(775,2945)
  Bottom Layer w7.87: v1(775,2945) 775,2970 C44.1@805,3000
Net-(U20-VCC): C54.1 L2.2 U20.8 | length 1441.8
  top_copper w7.87: U20.8@875,2885 875,2985 930,3040 1020,3040 1105,3125 1105,3575 1050,3630 1050,3735 1125,3810 v1(1125,3890) L2.2@1125,3985
  Bottom Layer w7.87: C54.1@985,3890 v1(1125,3890)
Net-(U20-VOFF): C43.1 U20.12 | length 267.8
  top_copper w7.87: v1(1005,3005) 1065,3005 1075,2995 U20.12@1075,2885
  Bottom Layer w7.87: C43.1@940,2960 960,2960 v1(1005,3005)
Net-(U20-VREF): C48.2 C64.1 R11.2 U20.13 | length 588.3
  top_copper w7.87: R11.2@1000,3400 1065,3400 1075,3390 1075,3235 v1(1075,3210)
  Bottom Layer w7.87: C48.2@1070,3160 1195,3160 1205,3150 C64.1@1205,3010 ; C48.2@1075,3160 v1(1075,3210)
Net-(U20-Y+SIN): L6.2 R11.1 U20.20 | length 2161.8
  top_copper w7.87: v1(725,3205) 725,3315 735,3325 860,3325 870,3335 R11.1@870,3400 ; v1(795,2755) 915,2635 v1(915,2615)
  Mid-Layer 2 w7.87: v1(725,3205) 725,3175 715,3165 715,3070 725,3060 760,3060 770,3050 770,3005 810,2965 810,2815 795,2800 v1(795,2755)
  Bottom Layer w7.87: L6.2@759.05,1613.74 810,1664.69 810,2105 885,2180 885,2265 950,2330 950,2460 960,2470 960,2605 950,2615 v1(915,2615)
Net-(U20-Y+SOUT): R10.2 U20.22 | length 139.1
  top_copper w7.87: R10.2@615,3400 625,3390 U20.22@625,3265
Net-(U23-P87): P10.1 U23.87 | length 1577
  top_copper w7.87: P10.1@1415,4100 1415,4120 1245,4120 1235,4110 1235,3875 1245,3865 1415,3865 1440,3840 1440,3695 1350,3605 1350,3410 1382.5,3377.5 1427.5,3377.5 1435,3370 1435,3130 1470,3095 U23.87@1530,3095
Net-(U23-PGCK4): P11.1 U23.82 | length 832.4
  top_copper w7.87: P11.1@1415,3925 1480,3925 1465,3910 1465,3233 1475,3223 U23.82@1530,3223
Net-(U23-SGCK3): P9.1 U23.51 | length 203.1
  top_copper w7.87: U23.51@2336,3320 2336,3465 2346,3475 P9.1@2390,3475
unconnected-(BUS1-3.3VAUX-PadA14): BUS1.A14
unconnected-(BUS1-+12V-PadA2): BUS1.A2
unconnected-(BUS1--12V-PadB1): BUS1.B1
unconnected-(BUS1-ACK64#-PadB60): BUS1.B60
unconnected-(BUS1-INTB#-PadB7): BUS1.B7
unconnected-(BUS1-INTC#-PadA7): BUS1.A7
unconnected-(BUS1-INTD#-PadB8): BUS1.B8
unconnected-(BUS1-PME#-PadA19): BUS1.A19
unconnected-(BUS1-REQ64#-PadA60): BUS1.A60
unconnected-(BUS1-RESERVED-PadA9): BUS1.A9
unconnected-(BUS1-RESERVED-PadA11): BUS1.A11
unconnected-(BUS1-RESERVED-PadA12): BUS1.A12
unconnected-(BUS1-RESERVED-PadA13): BUS1.A13
unconnected-(BUS1-RESERVED-PadA40): BUS1.A40
unconnected-(BUS1-RESERVED-PadA41): BUS1.A41
unconnected-(BUS1-RESERVED-PadB10): BUS1.B10
unconnected-(BUS1-RESERVED-PadB12): BUS1.B12
unconnected-(BUS1-RESERVED-PadB13): BUS1.B13
unconnected-(BUS1-RESERVED-PadB14): BUS1.B14
unconnected-(BUS1-TCK-PadB2): BUS1.B2
unconnected-(BUS1-TMS-PadA3): BUS1.A3
unconnected-(BUS1-TRST#-PadA1): BUS1.A1
unconnected-(U7-CLK{slash}2-Pad8): U7.8
unconnected-(U8-BVID1-Pad74): U8.74
unconnected-(U8-GVID1-Pad77): U8.77
unconnected-(U8-RVID1-Pad81): U8.81
unconnected-(U8-SYNC0-Pad4): U8.4
unconnected-(U8-SYNC1-Pad5): U8.5
unconnected-(U9-CR0-Pad27): U9.27
unconnected-(U9-CR3-Pad30): U9.30
unconnected-(U9-S0-Pad5): U9.5
unconnected-(U9-S1-Pad6): U9.6
unconnected-(U10-ACTIVE-Pad32): U10.32
unconnected-(U10-CAPTURE-Pad38): U10.38
unconnected-(U10-CBFLAG-Pad28): U10.28
unconnected-(U10-CLKX2-Pad105): U10.105
unconnected-(U10-FIELD_0-Pad26): U10.26
unconnected-(U10-FIELD_1-Pad25): U10.25
unconnected-(U10-FIELD_2-Pad27): U10.27
unconnected-(U10-HACTIVE-Pad35): U10.35
unconnected-(U10-SERROR-Pad37): U10.37
unconnected-(U10-TDO-Pad101): U10.101
unconnected-(U10-VACTIVE-Pad33): U10.33
unconnected-(U10-VALID-Pad29): U10.29
unconnected-(U10-VID1_C-Pad127): U10.127
unconnected-(U10-VID1_Y-Pad154): U10.154
unconnected-(U10-VID2_C-Pad129): U10.129
unconnected-(U10-VID2_Y-Pad152): U10.152
unconnected-(U10-VID3_C-Pad131): U10.131
unconnected-(U10-VID3_Y-Pad150): U10.150
unconnected-(U10-XTAL2_IN-Pad106): U10.106
unconnected-(U10-XTAL2_OUT-Pad107): U10.107
unconnected-(U11-NC-Pad134): U11.134
unconnected-(U11-NC-Pad136): U11.136
unconnected-(U12-NC-Pad11): U12.11
unconnected-(U12-NC-Pad29): U12.29
unconnected-(U12-NC-Pad33): U12.33
unconnected-(U12-NC-Pad35): U12.35
unconnected-(U12-NC-Pad36): U12.36
unconnected-(U12-NC-Pad37): U12.37
unconnected-(U12-NC-Pad38): U12.38
unconnected-(U12-NC-Pad45): U12.45
unconnected-(U12-NC-Pad46): U12.46
unconnected-(U12-NC-Pad48): U12.48
unconnected-(U12-NC-Pad66): U12.66
unconnected-(U12-NC-Pad71): U12.71
unconnected-(U12-PRD0-Pad67): U12.67
unconnected-(U12-PRD1-Pad68): U12.68
unconnected-(U12-PRD2-Pad69): U12.69
unconnected-(U12-PRD3-Pad70): U12.70
unconnected-(U13-NC-Pad11): U13.11
unconnected-(U13-NC-Pad29): U13.29
unconnected-(U13-NC-Pad33): U13.33
unconnected-(U13-NC-Pad35): U13.35
unconnected-(U13-NC-Pad36): U13.36
unconnected-(U13-NC-Pad37): U13.37
unconnected-(U13-NC-Pad38): U13.38
unconnected-(U13-NC-Pad45): U13.45
unconnected-(U13-NC-Pad46): U13.46
unconnected-(U13-NC-Pad48): U13.48
unconnected-(U13-NC-Pad66): U13.66
unconnected-(U13-NC-Pad71): U13.71
unconnected-(U13-PRD0-Pad67): U13.67
unconnected-(U13-PRD1-Pad68): U13.68
unconnected-(U13-PRD2-Pad69): U13.69
unconnected-(U13-PRD3-Pad70): U13.70
unconnected-(U14-NC-Pad11): U14.11
unconnected-(U14-NC-Pad29): U14.29
unconnected-(U14-NC-Pad33): U14.33
unconnected-(U14-NC-Pad35): U14.35
unconnected-(U14-NC-Pad36): U14.36
unconnected-(U14-NC-Pad37): U14.37
unconnected-(U14-NC-Pad38): U14.38
unconnected-(U14-NC-Pad45): U14.45
unconnected-(U14-NC-Pad46): U14.46
unconnected-(U14-NC-Pad48): U14.48
unconnected-(U14-NC-Pad66): U14.66
unconnected-(U14-NC-Pad71): U14.71
unconnected-(U14-PRD0-Pad67): U14.67
unconnected-(U14-PRD1-Pad68): U14.68
unconnected-(U14-PRD2-Pad69): U14.69
unconnected-(U14-PRD3-Pad70): U14.70
unconnected-(U15-NC-Pad11): U15.11
unconnected-(U15-NC-Pad29): U15.29
unconnected-(U15-NC-Pad33): U15.33
unconnected-(U15-NC-Pad35): U15.35
unconnected-(U15-NC-Pad36): U15.36
unconnected-(U15-NC-Pad37): U15.37
unconnected-(U15-NC-Pad38): U15.38
unconnected-(U15-NC-Pad45): U15.45
unconnected-(U15-NC-Pad46): U15.46
unconnected-(U15-NC-Pad48): U15.48
unconnected-(U15-NC-Pad66): U15.66
unconnected-(U15-NC-Pad71): U15.71
unconnected-(U15-PRD0-Pad67): U15.67
unconnected-(U15-PRD1-Pad68): U15.68
unconnected-(U15-PRD2-Pad69): U15.69
unconnected-(U15-PRD3-Pad70): U15.70
unconnected-(U16-NC-Pad11): U16.11
unconnected-(U16-NC-Pad29): U16.29
unconnected-(U16-NC-Pad33): U16.33
unconnected-(U16-NC-Pad35): U16.35
unconnected-(U16-NC-Pad36): U16.36
unconnected-(U16-NC-Pad37): U16.37
unconnected-(U16-NC-Pad38): U16.38
unconnected-(U16-NC-Pad45): U16.45
unconnected-(U16-NC-Pad46): U16.46
unconnected-(U16-NC-Pad48): U16.48
unconnected-(U16-NC-Pad66): U16.66
unconnected-(U16-NC-Pad71): U16.71
unconnected-(U16-PRD0-Pad67): U16.67
unconnected-(U16-PRD1-Pad68): U16.68
unconnected-(U16-PRD2-Pad69): U16.69
unconnected-(U16-PRD3-Pad70): U16.70
unconnected-(U17-NC-Pad11): U17.11
unconnected-(U17-NC-Pad29): U17.29
unconnected-(U17-NC-Pad33): U17.33
unconnected-(U17-NC-Pad35): U17.35
unconnected-(U17-NC-Pad36): U17.36
unconnected-(U17-NC-Pad37): U17.37
unconnected-(U17-NC-Pad38): U17.38
unconnected-(U17-NC-Pad45): U17.45
unconnected-(U17-NC-Pad46): U17.46
unconnected-(U17-NC-Pad48): U17.48
unconnected-(U17-NC-Pad66): U17.66
unconnected-(U17-NC-Pad71): U17.71
unconnected-(U17-PRD0-Pad67): U17.67
unconnected-(U17-PRD1-Pad68): U17.68
unconnected-(U17-PRD2-Pad69): U17.69
unconnected-(U17-PRD3-Pad70): U17.70
unconnected-(U18-NC-Pad11): U18.11
unconnected-(U18-NC-Pad29): U18.29
unconnected-(U18-NC-Pad33): U18.33
unconnected-(U18-NC-Pad35): U18.35
unconnected-(U18-NC-Pad36): U18.36
unconnected-(U18-NC-Pad37): U18.37
unconnected-(U18-NC-Pad38): U18.38
unconnected-(U18-NC-Pad45): U18.45
unconnected-(U18-NC-Pad46): U18.46
unconnected-(U18-NC-Pad48): U18.48
unconnected-(U18-NC-Pad66): U18.66
unconnected-(U18-NC-Pad71): U18.71
unconnected-(U18-PRD0-Pad67): U18.67
unconnected-(U18-PRD1-Pad68): U18.68
unconnected-(U18-PRD2-Pad69): U18.69
unconnected-(U18-PRD3-Pad70): U18.70
unconnected-(U19-NC-Pad11): U19.11
unconnected-(U19-NC-Pad29): U19.29
unconnected-(U19-NC-Pad33): U19.33
unconnected-(U19-NC-Pad35): U19.35
unconnected-(U19-NC-Pad36): U19.36
unconnected-(U19-NC-Pad37): U19.37
unconnected-(U19-NC-Pad38): U19.38
unconnected-(U19-NC-Pad45): U19.45
unconnected-(U19-NC-Pad46): U19.46
unconnected-(U19-NC-Pad48): U19.48
unconnected-(U19-NC-Pad66): U19.66
unconnected-(U19-NC-Pad71): U19.71
unconnected-(U19-PRD0-Pad67): U19.67
unconnected-(U19-PRD1-Pad68): U19.68
unconnected-(U19-PRD2-Pad69): U19.69
unconnected-(U19-PRD3-Pad70): U19.70
unconnected-(U20--B.Y-Pad3): U20.3
unconnected-(U20--R.Y-Pad1): U20.1
unconnected-(U20-H{slash}2-Pad4): U20.4
unconnected-(U20-Y-Pad5): U20.5
unconnected-(U21-CEO-Pad6): U21.6
unconnected-(U22-DOUT{slash}SGCK4-Pad73): U22.73
unconnected-(U22-P14-Pad14): U22.14
unconnected-(U22-P15-Pad15): U22.15
unconnected-(U22-P16-Pad16): U22.16
unconnected-(U22-P65-Pad65): U22.65
unconnected-(U22-P66-Pad66): U22.66
unconnected-(U22-PGCK2-Pad27): U22.27
unconnected-(U22-P{slash}A3-Pad6): U22.6
unconnected-(U22-P{slash}A4-Pad10): U22.10
unconnected-(U22-P{slash}A17-Pad3): U22.3
unconnected-(U22-P{slash}LDC-Pad30): U22.30
unconnected-(U22-P{slash}TCK-Pad5): U22.5
unconnected-(U22-P{slash}TDI-Pad4): U22.4
unconnected-(U22-TDO-Pad76): U22.76
unconnected-(U23-DOUT{slash}SGCK4-Pad76): U23.76
unconnected-(U23-P31{slash}HDC-Pad31): U23.31
unconnected-(U23-P33{slash}LDC-Pad33): U23.33
unconnected-(U23-P49-Pad49): U23.49
unconnected-(U23-P50-Pad50): U23.50
unconnected-(U23-P58-Pad58): U23.58
unconnected-(U23-P60-Pad60): U23.60
unconnected-(U23-P62-Pad62): U23.62
unconnected-(U23-P68-Pad68): U23.68
unconnected-(U23-P98-Pad98): U23.98
unconnected-(U23-P99-Pad99): U23.99
unconnected-(U23-P100-Pad100): U23.100
unconnected-(U23-SGCK1-Pad2): U23.2
unconnected-(U23-TDO-Pad79): U23.79
unconnected-(U24-PGCK3-Pad84): U24.84
unconnected-(U24-TDO-Pad121): U24.121
pads on no net: J4.0 U2.21 U2.22 U2.23 U2.24 U2.25 U2.26 U2.27 U2.28 U10.8 U10.9 U10.10 U10.11 U10.12 U10.13 U10.14 U10.15 U10.17 U10.18 U10.19 U10.20 U10.21 U10.22 U10.23 U10.24 U10.77 U10.133 U10.146 U10.148 U12. U13. U14. U15. U16. U17. U18. U19. U23.10 U24.8 U24.9 U24.30 U24.31 U24.49 U24.50 U24.71 U24.72 U24.89 U24.90 U24.111 U24.112 U24.129 U24.130 U24.136 U24.152 U24.153

## Polygon pours and split planes (outlines as drawn)
GND on Mid-Layer 1 "Polygon 0" (solid, pour order 2): 55.35,4173.03 12260.08,4184.84 12260.08,1149.41 5941.18,1149.41 5941.18,716.34 5567.17,716.34 5193.15,342.32 1630.16,322.64 1630.16,342.32 55.35,362.01
+5V on Mid-Layer 2 "Polygon 1" (solid, pour order 1): 5200,350 5560,695 5955,695 5955,1130 12230,1135 12230,4200 1485,4200 1485,3535 1086.9,3535 1030,3478.5 1030,3430 3.9,3430 0,370

## Other copper
Bottom Layer:
  text "TEXTE" at 497.53,423.14 h60

## Silkscreen, mask and mechanical layers (free items; w line width, h text height)
User.Drawings:
  lines w7.87: 5475,325 6710,325
  lines w8: 0,345 500,345 500,0 ; 0,3395 500,3395 500,4200 ; 195,190 395,190 ; 195,3550 395,3550 ; 200,345 200,3395 ; 295,90 295,3650 ; 11885,4200 11885,3800 12085,3800 12085,1135 ; 11985,4000 12185,4000 ; 12085,3900 12085,4100